# Altium PCB Smart_Connect_Board.PcbDoc (part 4 of 5)
Units mil, origin at the board's own origin, x right, y up, seen from the top; angles counter-clockwise.
Board outline 3543.31 x 3149.61 mil, 2 copper layers (Top Layer, Bottom Layer), stack 61.811 mil thick; 211 components, 139 nets, 660 pads, 247 vias.
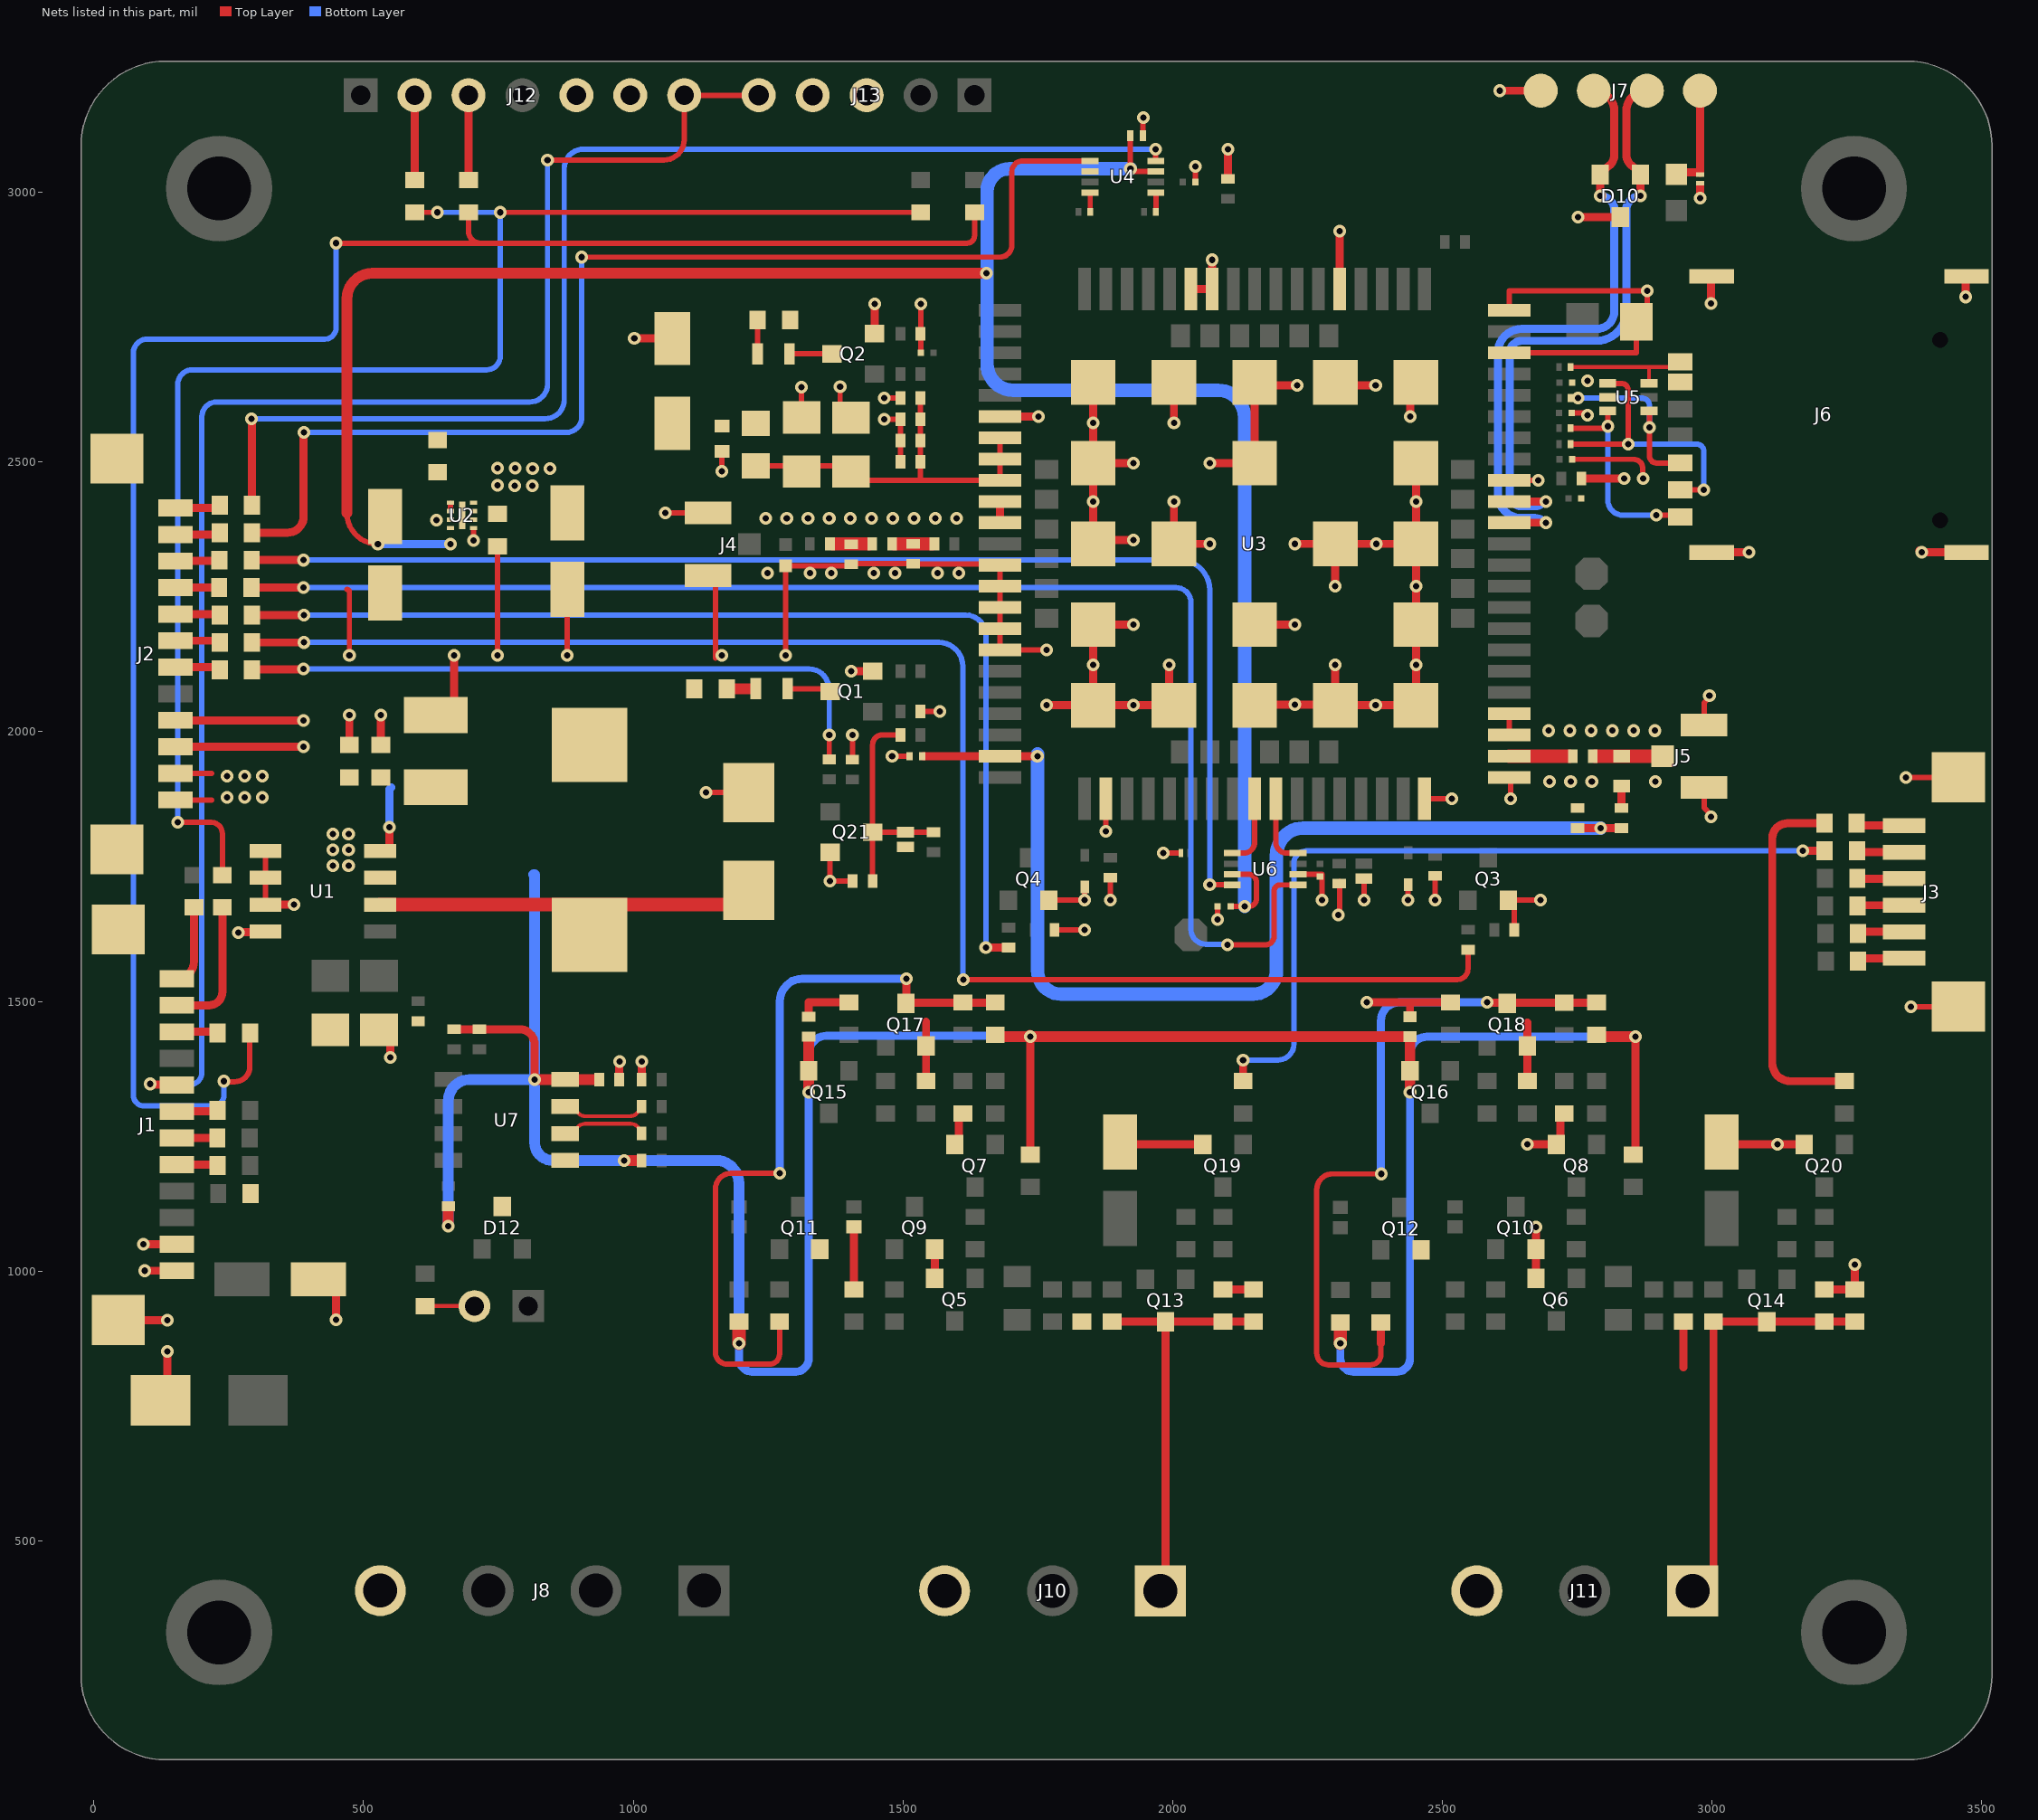
[diagram p2: the nets of this part, all layers, seen from the top]

## Via types
v1: diameter 23.62, hole 11.81, Top Layer to Bottom Layer, tented both sides, 233 vias
v2: diameter 23.62, hole 11.81, Top Layer to Bottom Layer, 14 vias

## Nets (pads, with @x,y where several pads share a name; then routed paths per layer and width w, separated by ;. In a path a pad name is that pad's centre, name@x,y a point inside that pad or via, vN(x,y) a via of type N, cw(c..) or ccw(c..) an arc to the next point about the centre after c; other vN are vias at no path point) (continued)
485-4_N: (continued)
  Top Layer w7: U7.7@873.76,1305.05 895.85,1295.7 ccw(c911.23,1305.05) 911.23,1287.05 993.83,1287.05 ccw(c993.83,1305.05) 1006.96,1292.74 1010.06,1296.05 R44.1@1015.56,1305.05
485-4_P: R46.1 U7.6 | length 155.2
  Top Layer w7: U7.6@873.76,1255.05 895.82,1265.33 cw(c910.59,1255.05) 910.59,1273.05 995.07,1273.05 cw(c995.07,1255.05) 1010.65,1264.05 R46.1@1015.56,1255.05
#SIM_CD: J6.CD R33.1 U5.6 | length 239.1
  Top Layer w7: R33.1@2738.25,2676.29 2883.32,2676.29 ; U5.6@2883.32,2645.88 2883.32,2676.29 ; J6.CD@2941.49,2685.78 cw(c2932,2685.78) 2932,2676.29 2883.32,2676.29
#SIM_CLK: J6.C3 R35.1 U5.3 | length 384.6
  Top Layer w10: R35.1@2738.25,2562.78 2796.07,2562.78 ccw(c2796.07,2573.66) 2806.94,2573.66 U5.3@2806.94,2594.7 ; v2(2897.22,2401.57) 2938.28,2401.57 J6.C3@2941.49,2398.37
  Bottom Layer w10: v2(2807.18,2566.37) 2807.18,2429.04 ccw(c2834.65,2429.04) 2834.65,2401.57 v2(2897.22,2401.57)
#SIM_DATA: J6.C7 R36.1 U5.1 | length 514.9
  Top Layer w10: R36.1@2738.25,2533.18 2738.25,2533.27 2790.03,2533.27 ; 2790.12,2533.37 v1(2845.13,2533.37) 2845.13,2632.63 ccw(c2831.88,2632.63) 2831.88,2645.88 U5.1@2806.94,2645.88 ; J6.C7@2941.49,2448.37 2985.25,2448.37 v2(2985.25,2448.74)
  Bottom Layer w10: v1(2845.13,2533.37) 2971.57,2533.37 cw(c2971.57,2519.68) 2985.25,2519.68 v2(2985.25,2448.74)
#SIM_RST: J6.C2 R34.1 U5.4 | length 349.1
  Top Layer w10: R34.1@2738.25,2618.92 v2(2751.93,2618.92) v2@2757.93,2618.92 ; U5.4@2883.32,2594.7 cw(c2883.32,2593.51) 2884.52,2593.51 v2(2884.52,2564.12) 2884.52,2511.08 ccw(c2897.22,2511.08) 2897.22,2498.37 J6.C2@2941.49,2498.37
  Bottom Layer w10: v2(2751.93,2618.92) 2869.37,2618.92 cw(c2869.37,2603.77) 2884.52,2603.77 v2(2884.52,2564.12)
AUX_HEATER: C35.2 J11.1 Q14.3 R85.1 SB2.1 | length 743
  Top Layer w15: J11.1@3003.03,425 SB2.1@3003.03,906.02 ; SB2.1@3003.03,906.02 Q14.3@3102.04,906.02 C35.2@3265.04,906.02
GND: C1.1 C2.1 C3.2 C4.1 C5.1 C6.1 C7.1 C8.2 C9.1 C10.2 C11.1 C12.2 C13.2 C14.1 C15.1 C16.1 C17.1 C18.1 C19.1 C20.2 C21.2 C23.2 C24.1 C25.1 C26.1 C27.1 C28.1 C29.1 C30.1 C31.2 C32.2 C33.1 C34.1 C35.1 C36.2 C37.2 C38.1 C39.1 C40.1 C41.1 C42.1 C43.1 C44.1 C45.1 C46.1 D1.1 D2.1 D3.2 D4.1 D5.1 D6.2 D8.1 D9.1 D10.3 D11.1 D12.3 D13.1 D14.2 J1.11 J1.12 J1.MP1 J1.MP2 J2.9 J2.10 J2.MP1 J2.MP2 J3.MP1 J3.MP2 J4.2 J4.3 J5.2 J5.3 J6.1 J6.2 J6.3 J6.4 J6.C5 J7.4 J8.4 J10.3 J11.3 J12.6 J13.4 Q1.2 Q2.2 Q3.2 Q4.2 Q5.2 Q6.2 Q7.2 Q8.2 Q9.2 Q10.2 Q11.2 Q12.2 Q17.2 Q18.2 Q19.2 Q20.2 Q21.2 R26.1 R29.1 R31.1 R38.1 R43.1 R76.1 R77.1 R78.1 R79.1 R82.1 R83.1 R84.2 R85.2 R91.1 R92.1 R95.1 U1.4 U1.5 U1.6 U1.7 U1.8 U2.5 U2.9 U3.2 U3.17 U3.18 U3.29 U3.39 U3.45 U3.46 U3.54 U3.58 U3.59 U3.61 U3.62 U3.63 U3.64 U3.65 U3.69 U3.70 U3.71 U3.72 U3.73 U3.74 U3.75 U3.76 U3.77 U3.78 U3.79 U3.80 U3.81 U3.82 U3.83 U3.84 U3.85 U3.86 U3.87 U3.88 U3.89 U3.91 U3.92 U3.94 U4.2 U5.2 U6.2 U7.5 | length 11156.4
  Top Layer w10: U1.7@317.98,1679.27 U1.6@317.98,1729.27 U1.5@317.98,1779.27 ; 468.99,2263.77 cw(c468.99,2259.14) 473.63,2259.14 v1(473.63,2141.28) v1@473.63,2136.28 ; v1(704.15,2354.32) U2.5@704.15,2375.73 ; v1@748.06,2136.28 v1(748.06,2141.28) C11.1@748.06,2344.02 ; v1@877.5,2136.28 v1(877.5,2141.28) C12.2@877.5,2263.77 ; v1@1057.5,2404.02 cw(c1059.23,2404.02) v1(1059.23,2405.74) J4.2@1138.8,2405.74 ; v1(1135.05,1887.18) D1.1@1214.09,1887.18 ; J4.3@1137.5,2288.3 cw(c1138.8,2288.3) J4.3@1138.8,2289.6 ; 1152.5,2136.28 J4.3@1152.5,2288.3 ; v1(1164.47,2482.68) D5.1@1164.47,2519.77 ; v1@1282.68,2136.28 v1(1282.68,2141.28) D4.1@1282.68,2307.91 C44.1@1404.21,2307.91 ; C19.1@1312.15,2582.68 v1(1312.15,2638.83) cw(c1315.75,2638.83) v1@1315.75,2642.44 ; Q21.2@1365.05,1776.47 v1(1365.05,1723.02) C42.1@1406.79,1723.02 ; C18.1@1383.54,2582.44 v1(1383.54,2639.69) ; C44.1@1404.21,2310.67 1405.28,2311.73 C45.1@1518.64,2311.73 ; R91.1@1406.26,1948.39 v1(1406.26,1994) ; v1(1465.53,2579.55) C14.1@1495.56,2579.55 C15.1@1495.56,2540.18 C16.1@1495.56,2500.81 ; v1(1465.53,2618.92) C17.1@1495.56,2618.92 ; v1@1479.29,1953.89 cw(c1480.02,1953.89) v1(1480.02,1954.63) C20.2@1512.24,1954.63 ; C45.1@1519.05,2311.33 1677.34,2311.33 cw(c1677.34,2308.96) U3.61@1679.71,2308.96 U3.62@1679.71,2269.59 U3.63@1679.71,2230.22 U3.64@1679.71,2190.85 U3.65@1679.71,2151.48 v1(1766.32,2151.48) ; R26.1@1532.56,2037.32 v1(1568.32,2037.32) cw(c1568.32,2035.13) v1@1570.51,2035.13 ; R29.1@1532.56,2738.09 1533.24,2738.09 v1(1533.24,2793.21) ; C21.2@1533.24,2702.66 R29.1@1533.24,2737.41 ; Q4.2@1770.55,1687.59 v1(1837.19,1687.59) 1837.19,1712.12 D11.1@1837.08,1712.12 ; R38.1@1781.15,1632.82 v1(1837.19,1632.82) ; v1@1872.5,1811.28 ccw(c1872.5,1815.33) v1(1876.56,1815.33) U3.2@1876.56,1875.89 ; v1(1884.63,1687.59) C30.1@1884.63,1729.33 ; C26.1@1944.95,3105.5 v1@1944.95,3132 ; v1@1944.95,3139 v1@1944.95,3132 ; v1@1945.6,3132 v1@1944.95,3132 ; v1(1982.85,1775.04) D13.1@2013.53,1775.04 ; C25.1@2042.57,3019.21 v1(2042.57,3048.22) ; v1(2083.75,1651.88) C32.2@2083.75,1675.83 ; U6.2@2232.85,1735.67 C31.2@2273.47,1735.67 ; v1(2277.41,1687.59) 2277.41,1731.73 ccw(c2273.47,1731.73) C31.2@2273.47,1735.67 ; C31.2@2277.41,1735.67 C31.2@2273.47,1735.67 ; v1(2307.46,1660.28) 2310.06,1662.88 C13.2@2310.06,1722.36 ; v1(2354.81,1687.59) D6.2@2354.81,1727.8 ; v1(2436.34,1687.59) D9.1@2436.34,1716.43 ; U3.17@2467.11,1875.89 v1(2518,1875.89) cw(c2518,1874.33) v1@2519.56,1874.33 ; v1(2486.98,1687.59) C24.1@2486.98,1732.95 ; U3.89@2624.59,1915.26 cw(c2624.59,1912.7) 2627.15,1912.7 v1(2627.15,1875.89) ; U3.91@2624.59,1994 U3.18@2624.59,2033.37 ; U3.29@2624.59,2466.44 2624.79,2466.24 2678.02,2466.24 v1(2678.22,2466.04) ; U3.92@2624.59,2702.66 2860.12,2702.66 R92.1@2860.12,2760.13 ; U3.94@2624.59,2781.4 2624.59,2817.45 v1(2880.12,2817.45) R92.1@2880.12,2760.13 ; R31.1@2633.72,1632.82 2633.72,1684.64 cw(c2636.66,1684.64) 2636.66,1687.59 v1(2682.5,1687.59) ; C28.1@2740.22,2591.36 2761.06,2591.36 cw(c2761.01,2581.36) v2(2769.38,2586.83) v2@2771.99,2589.43 ; C27.1@2741.24,2505.17 2855.13,2505.17 cw(c2855.13,2488.62) 2871.63,2489.99 v1(2872.47,2469.73) ; J5.2@2985.5,1896.55 2985.5,1859.16 2998.46,1846.21 v1(2998.46,1842.52) ; J5.3@2985.5,2012.7 2985.5,2053.63 2995.46,2063.59 v1(2995.46,2067.28) ; v1@3355.65,1911.28 cw(c3359.86,1911.28) v1(3359.86,1915.49) J3.MP2@3457.12,1915.49 ; v1@3364.53,1485.86 cw(c3368.96,1485.86) v1(3368.96,1490.29) J3.MP1@3457.12,1490.29
  Top Layer w15: J1.MP2@42.71,909.07 J1.MP2@45.02,909.07 v1(135.82,909.07) ; v1(91.93,1049.81) J1.11@153.69,1049.81 ; v1(94.23,1000.6) J1.12@153.69,1000.6 J1.12@156,1000.6 ; D2.1@136.37,757.55 v1(136.37,850.66) ; J2.10@151.38,1972.02 v1(388.85,1972.02) ; J2.9@151.37,2021 v1(388.85,2021) ; v1(267.48,1627.81) 268.2,1628.54 317.25,1628.54 U1.8@317.98,1629.27 ; C4.1@290.36,1143.58 C4.1@290.87,1144.09 ; U1.7@317.98,1679.27 v1(370.59,1679.27) ; C8.2@415.94,984.85 425.23,984.85 449.23,960.86 v1(449.23,909.63) ; C2.1@473.63,1975.37 v1(473.63,2031.01) ; U1.4@530.58,1779.27 542.36,1779.27 547.85,1784.76 v1(547.85,1823.01) ; C1.1@532.09,1975.38 v1(532.09,2031.01) ; v1(549.63,1395.93) C5.1@549.63,1447.26 ; C3.2@633.91,2031.01 ccw(c633.91,2064.6) 667.5,2064.6 v1@667.5,2136.28 ; U7.5@873.76,1205.05 U7.5@875.5,1203.31 ; C33.1@974.06,1355.05 974.06,1388.34 v1(974.57,1388.34) ; v1(1001.96,2729.25) D3.2@1072.5,2729.25 ; R43.1@1015.56,1355.05 v1@1015.56,1388.34 ; C40.1@1325.26,1471.52 1325.26,1498.02 R76.1@1400.06,1498.02 ; v1(1404.42,2112.11) Q1.2@1443.79,2112.11 ; Q2.2@1447.42,2738.09 v1(1447.42,2793.21) ; R82.1@1542.92,1352.36 Q17.2@1542.92,1417.67 1542.92,1462.57 ; Q5.2@1558.96,986.37 Q9.2@1558.96,1040.51 ; Q7.2@1603.77,1237.31 1603.77,1284.95 R77.1@1611.17,1292.36 ; U3.59@1679.71,2387.7 U3.58@1679.71,2427.07 ; U3.54@1679.71,2584.55 v1(1751.39,2584.55) ccw(c1751.39,2586.28) v1@1753.12,2586.28 ; v1(1766.32,2049.11) U3.69@1852.93,2049.11 ; U3.83@1852.93,2348.33 U3.83@1852.93,2355.33 ; U3.81@1852.93,2647.54 v1(1852.93,2572.74) U3.82@1852.93,2497.93 ; C36.2@1903.04,1234.26 1903.04,1234.76 Q19.2@2056,1234.76 ; v1(1927.74,2198.72) U3.84@1852.93,2198.72 v1(1852.93,2123.92) U3.69@1852.93,2049.11 ; v1(1927.74,2355.33) U3.83@1852.93,2355.33 ; v1(1927.74,2497.93) U3.82@1852.93,2497.93 ; v1(1993.54,2123.92) U3.70@1993.54,2049.11 ; U3.70@2002.54,2049.11 U3.70@1993.54,2049.11 ; v1(2002.54,2427.07) U3.88@2002.54,2348.33 v1(2069.46,2348.33) ; v1(2002.54,2572.74) U3.80@2002.54,2647.54 ; U3.46@2034.04,2820.77 U3.45@2073.41,2820.77 v1(2073.41,2875) ; v1(2069.46,2497.93) U3.87@2152.15,2497.93 U3.79@2152.15,2647.54 2157.15,2642.54 v1(2230.89,2642.54) ; R84.2@2093.39,966.02 C34.1@2150.04,966.02 ; R95.1@2103.01,3025.06 v1(2103.02,3080.29) ; U3.71@2152.15,2049.11 cw(c2153.58,2049.11) 2153.58,2050.55 v1(2226.92,2050.55) U3.72@2300.32,2050.55 ; U3.85@2152.15,2198.72 v1(2226.92,2198.72) ; v1(2226.92,2348.33) U3.86@2301.75,2348.33 ; U3.72@2300.32,2049.11 U3.72@2301.75,2049.11 ; v1(2301.75,2123.92) U3.72@2301.75,2049.11 ; v1(2301.75,2269.59) U3.86@2301.75,2348.33 ; U3.78@2301.75,2647.54 2306.75,2642.54 v1(2376.56,2642.54) ; U3.39@2309.63,2820.77 v1(2309.63,2928.4) cw(c2312.5,2928.4) v1@2312.5,2931.28 ; v1(2360.5,1498.02) 2440.26,1498.02 ; C41.1@2440.26,1471.52 2440.26,1498.02 ; v1(2440.36,2584.55) U3.77@2440.36,2647.54 ; U3.76@2451.36,2497.93 v1(2451.36,2427.07) U3.75@2451.36,2348.33 ; R78.1@2515.06,1498.02 2440.26,1498.02 ; v1@2604.08,3191.28 ccw(c2606.72,3191.28) v1(2606.72,3188.63) J7.4@2682.65,3188.63 ; v1(2657.92,1234.76) Q8.2@2711.36,1234.76 ; R83.1@2657.91,1352.36 Q18.2@2657.92,1417.67 2657.92,1461.04 ; Q6.2@2673.96,986.37 v1(2673.96,1081.62) ; Q8.2@2718.77,1237.31 2718.77,1284.95 R79.1@2726.18,1292.36 ; v1@2749.08,2951.28 cw(c2752.07,2951.28) v1(2752.07,2954.26) D10.3@2830.28,2954.26 ; C43.1@2757.93,2469.35 v1(2837.5,2469.35) ; 2947.04,821.28 C39.1@2947.04,906.02 ; D8.1@2977.92,3013.32 2977.92,2989.38 v1(2978.14,2989.17) ; v1(2998.29,2794.28) J6.2@2998.29,2842.98 ; J6.1@2999.75,2332.63 v1(3068.99,2332.63) ; C37.2@3018.04,1234.26 3018.04,1234.76 v1(3121.94,1234.76) Q20.2@3171,1234.76 ; R85.2@3208.39,966.02 C35.1@3265.04,966.02 v1(3265.04,1012.28) ; v1@3385.34,2336.28 ccw(c3388.99,2336.28) v1(3388.99,2332.63) J6.4@3472.19,2332.63 ; v1(3470.34,2806.28) J6.3@3470.34,2842.58 ; U3.69@1852.93,2049.11 v1(1927.74,2049.11) U3.70@1993.54,2049.11 ; U3.83@1852.93,2355.33 v1(1852.93,2427.07) U3.82@1852.93,2497.93 ; U3.72@2301.75,2049.11 v1(2376.56,2049.11) U3.73@2451.36,2049.11 v1(2451.36,2123.92) U3.74@2451.36,2198.72 v1(2451.36,2269.59) U3.75@2451.36,2348.33 ; U3.86@2301.75,2348.33 v1(2377.5,2348.33) U3.75@2451.36,2348.33
  Bottom Layer w15: v1(547.85,1823.01) 547.85,1893.32 550.91,1896.38
  other v1: 1016.07,1388.34 2698.68,1907.26 2738.05,1907.26 2777.42,1907.26 2895.53,1907.26 2697.5,2002 2736.87,2002 2776.24,2002 2815.61,2002 2854.98,2002 2894.35,2002 667.5,2141.28 1164.5,2141.28 1249.07,2293.96 1327.81,2293.96 1367.18,2293.96 1445.92,2293.96 1485.29,2293.96 1564.03,2293.96 1603.4,2293.96 1245.27,2395.69 1284.64,2395.69 1324.01,2395.69 1363.38,2395.69 1402.75,2395.69 1442.12,2395.69 1481.49,2395.69 1520.86,2395.69 1560.23,2395.69 1599.6,2395.69 1945.6,3139
  other v2: 2769.38,2650.53
GNSS_ANT: C22.2 J5.1 L2.2 | length 125.6
  Top Layer w25: C22.2@2783.21,1954.63 J5.1@2908.79,1954.63
GNSS_MCU_RX: R2.1 U4.8 | length 2327.8
  Top Layer w10: v1(1968.87,3080.29) 1968.87,3058.71 U4.8@1969,3058.58
  Top Layer w15: v1@292.7,2580.28 292.7,2420.28 R2.1@293.05,2419.94
  Bottom Layer w10: v1(292.36,2580.28) 836.66,2580.28 ccw(c836.66,2615.61) 872,2615.61 872,3044.13 cw(c908.16,3044.13) 908.16,3080.29 v1@1968.6,3080.29
GNSS_MCU_TX: R4.1 U4.1 | length 2199.6
  Top Layer w10: v1(904.58,2880) 1679.71,2880 ccw(c1679.71,2902.29) 1702,2902.29 1702,3038.03 cw(c1722.55,3038.03) 1722.55,3058.58 U4.1@1846.95,3058.58
  Top Layer w15: R4.1@293.05,2369.06 358.72,2369.06 ccw(c358.72,2399.19) 388.85,2399.19 388.85,2554.63 v1(389.27,2555.05)
  Bottom Layer w10: v1(389.27,2555.05) 876.1,2555.05 ccw(c876.1,2583.52) 904.58,2583.52 v1(904.58,2880)
GNSS_PWRCTRL: R13.1 R90.1 | length 1222.1
  Top Layer w10: R90.1@1363.42,1948.78 v1(1363.42,1994)
  Top Layer w15: R13.1@293.05,2114.66 293.85,2115.47 388.04,2115.47 v1(388.85,2116.28)
  Bottom Layer w10: v1(388.85,2116.28) 1168.05,2116.28 1326.06,2116.28 cw(c1326.06,2079.71) 1362.62,2079.71 cw(c1318.42,2071.28) 1363.42,2071.28 v1(1363.42,1994)
GNSS_PWRCTRL_M: C42.2 D14.1 Q21.3 R20.2 R41.1 | length 427.6
  Top Layer w10: C42.2@1443.79,1723.02 Q21.3@1443.79,1813.87 ; R20.2@1495.56,1994 1461.9,1994 ccw(c1461.9,1975.89) 1443.79,1975.89 Q21.3@1443.79,1813.87 ; R41.1@1556.46,1813.87 D14.1@1504.56,1813.87 Q21.3@1443.79,1813.87
GNSS_RXD: R21.2 U4.4 | length 35.9
  Top Layer w10: U4.4@1846.95,2999.53 1847.37,2999.53 R21.2@1847.37,2964.06
GNSS_TXD: R22.2 U4.5 | length 35.5
  Top Layer w10: R22.2@1969,2964.06 U4.5@1969,2999.53
GSM_PWR: C11.2 C12.1 D3.1 D5.2 FB1.2 J2.11 J2.12 R24.2 R27.2 U2.3 U2.6 U2.7 U2.8 | length 133.3
  Top Layer w10: J2.12@151.38,1873.6 218.05,1873.6 ; J2.11@151.38,1922.81 218.05,1922.81
  other v1: 247.05,1878.6 279.5,1878.6 311.94,1878.6 247.05,1917.81 279.5,1917.81 311.94,1917.81 634.92,2392.27 812.86,2455.86 748.06,2456.69 780.46,2456.28 845.67,2487.85 780.87,2488.68 813.27,2488.27 748.47,2489.09
GSM_PWR_EN: R8.1 R37.2 | length 2007.3
  Top Layer w15: R8.1@293.05,2216.42 v1@388.85,2216.42 ; v1(1653.68,1599.82) R37.2@1695.74,1599.82
  Bottom Layer w10: v1@388.85,2216.42 v1(389.36,2216.42) 1616.29,2216.42 cw(c1616.29,2179.04) 1653.68,2179.04 v1(1653.68,1599.82) v1@1653.68,1595.82
GSM_RST: R10.1 R30.1 | length 2907.2
  Top Layer w10: v1(1611.76,1540.44) 2527.66,1540.44 ccw(c2527.66,1560.59) 2547.82,1560.59 R30.1@2547.82,1595.82
  Top Layer w15: R10.1@293.05,2165.54 v1@388.85,2165.54
  Bottom Layer w10: v1@388.85,2165.54 v1(389.36,2165.54) 1566.72,2165.54 cw(c1566.72,2121.08) 1611.18,2121.08 1611.18,1541.02 v1(1611.76,1540.44)
GSM_RX: U3.10 U6.4 | length 133.7
  Top Layer w10: U3.10@2191.52,1875.89 2191.52,1794.91 ccw(c2211.38,1794.91) 2211.38,1775.04 U6.4@2232.85,1775.04
GSM_TX: U3.9 U6.5 | length 133.7
  Top Layer w10: U6.5@2110.81,1775.04 2132.27,1775.04 ccw(c2132.27,1794.91) 2152.15,1794.91 U3.9@2152.15,1875.89
GSM_USB_D_N: D10.1 J7.2 U3.28 | length 1128.2
  Top Layer w15: U3.28@2624.59,2427.07 v1(2692.5,2427.07) ; v1(2867.69,2993.63) D10.1@2867.69,3033 2859.04,3043.61 2851.32,3049.71 cw(c2867.69,3070.43) 2841.28,3070.43 2841.28,3150.42 cw(c2879.5,3150.42) J7.2@2879.5,3188.63
  Bottom Layer w15: v1(2692.5,2427.07) ccw(c2692.5,2421.43) 2688.52,2425.42 cw(c2671.54,2442.4) 2671.54,2418.38 2646.46,2418.38 cw(c2646.46,2439.63) 2625.21,2439.63 2625.21,2702.66 cw(c2647.47,2702.66) 2647.47,2724.92 2785.85,2724.92 ccw(c2785.85,2780.35) 2841.28,2780.35 2841.28,2967.23 cw(c2867.69,2967.23) v1(2867.69,2993.63)
GSM_USB_D_P: D10.2 J7.3 U3.27 | length 1162.8
  Top Layer w15: U3.27@2624.59,2387.7 v1(2692.5,2387.7) ; J7.3@2781.07,3188.63 cw(c2781.07,3150.42) 2819.28,3150.42 2819.28,3070.18 cw(c2792.88,3070.18) 2808.82,3049.13 2801.52,3043.61 D10.2@2792.88,3033 v1(2792.88,2993.63)
  Bottom Layer w15: v1(2692.5,2387.7) cw(c2692.5,2393.33) 2688.52,2389.35 ccw(c2671.54,2372.36) 2671.54,2396.38 2646.46,2396.38 cw(c2646.46,2439.63) 2603.21,2439.63 2603.21,2702.66 cw(c2647.47,2702.66) 2647.47,2746.92 2785.85,2746.92 ccw(c2785.85,2780.35) 2819.28,2780.35 2819.28,2967.23 ccw(c2792.88,2967.23) v1(2792.88,2993.63)
HEAT_CNTRL: R19.1 R72.2 | length 682.4
  Top Layer w15: R19.1@3208.65,1830.28 3140.21,1830.28 ccw(c3140.21,1802.06) 3112,1802.06 3112,1385.95 ccw(c3145.97,1385.95) 3145.97,1351.98 3245.8,1351.98 R72.2@3245.8,1352.36
HEATER: C34.2 J10.1 Q13.3 R84.1 SB1.1 | length 761.1
  Top Layer w15: SB1.1@1888.03,906.02 Q13.3@1987.04,906.02 ; J10.1@1987.04,406.98 Q13.3@1987.04,906.02 ; C34.2@2150.04,906.02 Q13.3@1987.04,906.02
IND_A: Q18.3 R63.2 R69.1 R75.1 | length 1384.2
  Top Layer w10: R63.2@2386.17,904.83 2386.17,845.04 cw(c2367.22,845.04) 2367.22,826.09 2289.02,826.09 cw(c2289.02,847.71) 2267.4,847.71 2267.4,1151.09 cw(c2296.4,1151.09) 2296.4,1180.09 v1(2386.71,1180.09)
  Top Layer w15: 2386.23,866.28 R63.2@2386.23,906.02 ; v1(2583.12,1498.02) 2583.92,1497.21 2619.71,1497.21 Q18.3@2620.52,1496.41 ; Q18.3@2621.32,1497.21 2785.37,1497.21 R69.1@2786.18,1498.02
  Bottom Layer w15: v1@2386.24,1180.09 2386.24,1463.92 cw(c2420.34,1463.92) 2420.34,1498.02 v1(2583.12,1498.02)
IND_M: Q17.3 R62.2 R68.1 R74.1 | length 1424.3
  Top Layer w10: R62.2@1271.23,906.02 1271.23,846.23 cw(c1252.28,846.23) 1252.28,827.28 1174.08,827.28 cw(c1174.08,848.9) 1152.46,848.9 1152.46,1152.28 cw(c1181.46,1152.28) 1181.46,1181.28 v1(1271.76,1181.28)
  Top Layer w15: Q17.3@1505.52,1496.41 Q17.3@1506.32,1497.21 ; v1@1506.32,1536.95 Q17.3@1506.32,1497.21 ; R68.1@1671.18,1498.02 1670.37,1497.21 Q17.3@1506.32,1497.21
  Bottom Layer w15: v1(1271.76,1181.28) 1271.76,1500.12 cw(c1313.6,1500.12) 1313.6,1541.96 v1(1506.32,1541.96)
IO_C9: R18.1 R70.2 | length 1482.5
  Top Layer w15: R70.2@2130.8,1352.36 v1(2130.8,1391.28) ; v1@3168.99,1779.19 R18.1@3209.16,1779.19
  Bottom Layer w10: v1(2130.8,1391.28) 2195.36,1391.28 ccw(c2195.36,1421) 2225.08,1421 2225.08,1756.13 cw(c2248.07,1756.13) 2248.07,1779.11 v1(3168.99,1779.11)
IRQ_NFC: J1.5 J12.7 J13.5 | length 2962.7
  Top Layer w10: v1(840.98,3060.07) 1056.59,3060.07 ccw(c1056.59,3097.97) 1094.49,3097.97 J12.7@1094.49,3180.22 ; J12.7@1094.54,3180.22 J13.5@1232.78,3180.22
  Top Layer w15: v1(104,1347) 104.95,1346.05 152.73,1346.05 J1.5@153.68,1345.09
  Bottom Layer w10: v1(104,1347) 105.32,1345.68 177.82,1345.68 ccw(c177.82,1368) 200.14,1368 200.14,2584.14 cw(c227.33,2584.14) 227.33,2611.33 808.07,2611.33 ccw(c808.07,2644.24) 840.98,2644.24 v1(840.98,3060.07)
MCU_RX: R6.1 U6.8 | length 2396.6
  Top Layer w10: v1(2068.8,1716.34) 2068.98,1716.16 2110.63,1716.16 U6.8@2110.81,1715.99
  Top Layer w15: R6.1@292.54,2318.18 v1(388.85,2318.18)
  Bottom Layer w10: v1(388.85,2318.18) 2013.68,2318.18 cw(c2013.68,2263.06) 2068.8,2263.06 v1(2068.8,1716.34)
MCU_TX: R7.1 U6.1 | length 2678.7
  Top Layer w10: v1(2101.53,1604.54) 2171.83,1604.54 ccw(c2171.83,1620.91) 2188.21,1620.91 2188.21,1704.51 cw(c2199.68,1704.51) 2199.68,1715.99 U6.1@2232.85,1715.99
  Top Layer w15: R7.1@292.03,2267.3 v1(388.34,2267.3) v1@388.85,2267.3
  Bottom Layer w10: v1@388.85,2267.3 2006.48,2267.3 cw(c2006.48,2239.74) 2034.04,2239.74 2034.04,1633.72 ccw(c2061.73,1633.72) 2061.73,1606.02 2100.04,1606.02 cw(c2100.04,1604.54) v1(2101.53,1604.54)
MISO_NFC: J12.2 R87.1 | length 157.2
  Top Layer w15: R87.1@594.54,3023.03 J12.2@594.54,3180.22
MISO_NFC_AUX: R3.1 R86.2 R87.2 | length 2822.1
  Top Layer w10: v1(155.33,1832) 217.19,1832 cw(c217.19,1811.14) 238.05,1811.14 R3.1@238.05,1734.27 ; R87.2@594.54,2963.03 v1(636.98,2963.03) cw(c636.98,2959.28) v1@640.73,2959.28 ; v1(753.33,2963.03) R86.2@1532.78,2963.03
  Bottom Layer w10: v1(155.33,1832) 155.33,2643.7 cw(c182.64,2643.7) 182.64,2671 728.1,2671 ccw(c728.1,2696.24) 753.33,2696.24 v1(753.33,2963.03) v1(636.98,2963.03)
MOSI_NFC: J12.3 R89.1 | length 157.2
  Top Layer w15: R89.1@694.54,3023.03 J12.3@694.54,3180.22
MOSI_NFC_AUX: R5.1 R88.2 R89.2 | length 3584.6
  Top Layer w10: v2(241,1352) 241.97,1351.03 261.32,1351.03 ccw(c261.32,1378.56) 288.85,1378.56 288.85,1441.52 R5.1@289.36,1441.52 ; v2(449,2906) 716.51,2905.99 ; R89.2@694.54,2963.03 694.54,2927.96 ccw(c716.51,2927.96) 716.51,2905.98 ; R88.2@1632.78,2963.03 1632.78,2919.79 cw(c1618.97,2919.79) 1618.97,2905.99 716.51,2905.99
  Bottom Layer w10: v2(241,1352) 241,1326.04 cw(c220.96,1326.04) 220.96,1306 93.04,1306 cw(c93.04,1326.04) 73,1326.04 73,2702.07 cw(c98.93,2702.07) 98.93,2728 428,2728 ccw(c428,2749) 449,2749 v2(449,2906)
NetC14_2: C14.2 C15.2 C16.2 C17.2 C18.2 C19.2 FB1.1 U3.55 U3.56 U3.57 | length 696.5
  Top Layer w10: FB1.1@1227.15,2493.03 1392.95,2493.03 cw(c1392.95,2482.44) C18.2@1403.54,2482.44 1419.54,2466.44 1515.57,2466.44 1532.56,2466.44 ; C17.2@1532.56,2618.92 C14.2@1532.56,2579.55 1532.56,2466.44 ; U3.55@1679.71,2545.18 U3.56@1679.71,2505.81 U3.57@1679.71,2466.44 1532.56,2466.44
NetC22_1: C22.1 U3.90 | length 111.7
  Top Layer w25: U3.90@2624.59,1954.63 C22.1@2736.32,1954.63
NetC44_2: C44.2 R93.2 R94.1 | length 67.7
  Top Layer w10: R94.1@1442.98,2347.67 R94.1@1442.98,2348.33
  Top Layer w25: R93.2@1370.1,2348.33 R94.1@1437.18,2348.33
NetC45_2: C45.2 C47.1 R94.2 | length 70.7
  Top Layer w25: R94.2@1483.65,2348.33 C45.2@1519.05,2348.33 C47.1@1554.37,2348.33
NetD1_2: D1.2 L1.1 U1.2 | length 698.8
  Top Layer w25: U1.2@530.58,1679.27 1187.28,1679.27 ccw(c1187.28,1706.08) D1.2@1214.09,1706.08
NetD8_2: D8.2 F1.2 J7.1 | length 195.6
  Top Layer w15: F1.2@2934.08,3037.16 2977.76,3037.16 ; D8.2@2977.92,3036.69 J7.1@2977.92,3188.63
NetJ1_1: J1.1 R1.2 | length 150.5
  Top Layer w15: J1.1@153.68,1541.94 ccw(c153.68,1573.83) 185.57,1573.83 R1.2@185.57,1674.27
NetJ1_2: J1.2 R3.2 | length 255.4
  Top Layer w15: J1.2@153.68,1492.73 213.51,1492.73 ccw(c213.51,1517.26) 238.05,1517.26 R3.2@238.05,1674.27
NetJ1_3: J1.3 R5.2 | length 76.8
  Top Layer w15: J1.3@153.68,1443.52 227.36,1443.52 cw(c227.36,1441.52) R5.2@229.36,1441.52
NetJ1_6: J1.6 R9.2 | length 76.8
  Top Layer w15: J1.6@153.68,1295.88 227.35,1295.88 ccw(c227.35,1297.88) R9.2@229.36,1297.88
NetJ1_7: J1.7 R12.2 | length 75.2
  Top Layer w15: J1.7@153.68,1246.67 R12.2@228.85,1246.67
NetJ1_8: J1.8 R15.2 | length 76.8
  Top Layer w15: J1.8@153.68,1197.45 227.36,1197.45 cw(c227.36,1195.45) R15.2@229.36,1195.45
NetJ2_1: J2.1 R2.2 | length 84.5
  Top Layer w15: J2.1@151.37,2414.94 228.05,2414.94 ccw(c228.05,2419.94) R2.2@233.05,2419.94
NetJ2_2: J2.2 R4.2 | length 83.6
  Top Layer w15: J2.2@151.37,2365.72 229.71,2365.72 ccw(c229.71,2369.06) R4.2@233.05,2369.06
NetJ2_3: J2.3 R6.2 | length 82.1
  Top Layer w15: J2.3@151.37,2316.51 230.87,2316.51 ccw(c230.87,2318.18) R6.2@232.54,2318.18
NetJ2_4: J2.4 R7.2 | length 80.7
  Top Layer w15: J2.4@151.37,2267.3 R7.2@232.03,2267.3
NetJ2_5: J2.5 R8.2 | length 82.6
  Top Layer w15: J2.5@151.37,2218.09 231.38,2218.09 cw(c231.38,2216.42) R8.2@233.05,2216.42
NetJ2_6: J2.6 R10.2 | length 83.6
  Top Layer w15: J2.6@151.37,2168.87 229.71,2168.87 cw(c229.71,2165.54) R10.2@233.05,2165.54
NetJ2_7: J2.7 R13.2 | length 84.5
  Top Layer w15: J2.7@151.37,2119.66 228.05,2119.66 cw(c228.05,2114.66) R13.2@233.05,2114.66
NetJ3_1: J3.1 R11.2 | length 88.3
  Top Layer w15: R11.2@3271.19,1574.85 cw(c3276.19,1574.85) 3276.19,1579.85 J3.1@3356.6,1579.85
NetJ3_2: J3.2 R14.2 | length 87.8
  Top Layer w15: R14.2@3270.68,1625.93 cw(c3273.82,1625.93) 3273.82,1629.07 J3.2@3356.67,1629.07
NetJ3_3: J3.3 R16.2 | length 87.2
  Top Layer w15: R16.2@3270.18,1677.02 cw(c3271.43,1677.02) 3271.43,1678.28 J3.3@3356.65,1678.28
NetJ3_4: J3.4 R17.2 | length 87.6
  Top Layer w15: R17.2@3269.67,1728.1 3269.67,1727.5 J3.4@3356.68,1727.5
NetJ3_5: J3.5 R18.2 | length 89
  Top Layer w15: R18.2@3269.16,1779.19 ccw(c3271.65,1779.19) 3271.65,1776.71 J3.5@3356.75,1776.71
NetJ3_6: J3.6 R19.2 | length 90.6
  Top Layer w15: R19.2@3268.65,1830.28 ccw(c3273.01,1830.28) 3273.01,1825.92 J3.6@3356.75,1825.92
NetJ9_2: J9.2 R45.2 | length 91.8
  Top Layer w7: R45.2@614.28,935.53 R45.2@614.28,935.05 J9.2@705.57,935.05
NetL2_1: L2.1 R23.2 | length 41.6
  Top Layer w15: R23.2@2832.15,1858.33 2832.58,1858.33 L2.1@2832.58,1899.51
NetLED1_1: LED1.1 R24.1 | length 52.7
  Top Layer w20: R24.1@1173.22,2079.71 LED1.1@1225.96,2079.71
NetLED1_2: LED1.2 Q1.3 | length 79
  Top Layer w10: LED1.2@1286.09,2079.71 Q1.3@1365.05,2079.71
NetLED2_1: LED2.1 R27.1 | length 62.7
  Top Layer w10: LED2.1@1230.66,2700.69 R27.1@1230.66,2763.39
NetLED2_2: LED2.2 Q2.3 | length 79
  Top Layer w10: LED2.2@1289.71,2700.69 Q2.3@1368.68,2700.69
NetLED3_1: LED3.1 R54.2 | length 115.6
  Top Layer w15: R54.2@1409.04,966.02 LED3.1@1409.04,1081.62